# Allegro board mib_rev1_v2t_m1_gnd_moved.brd
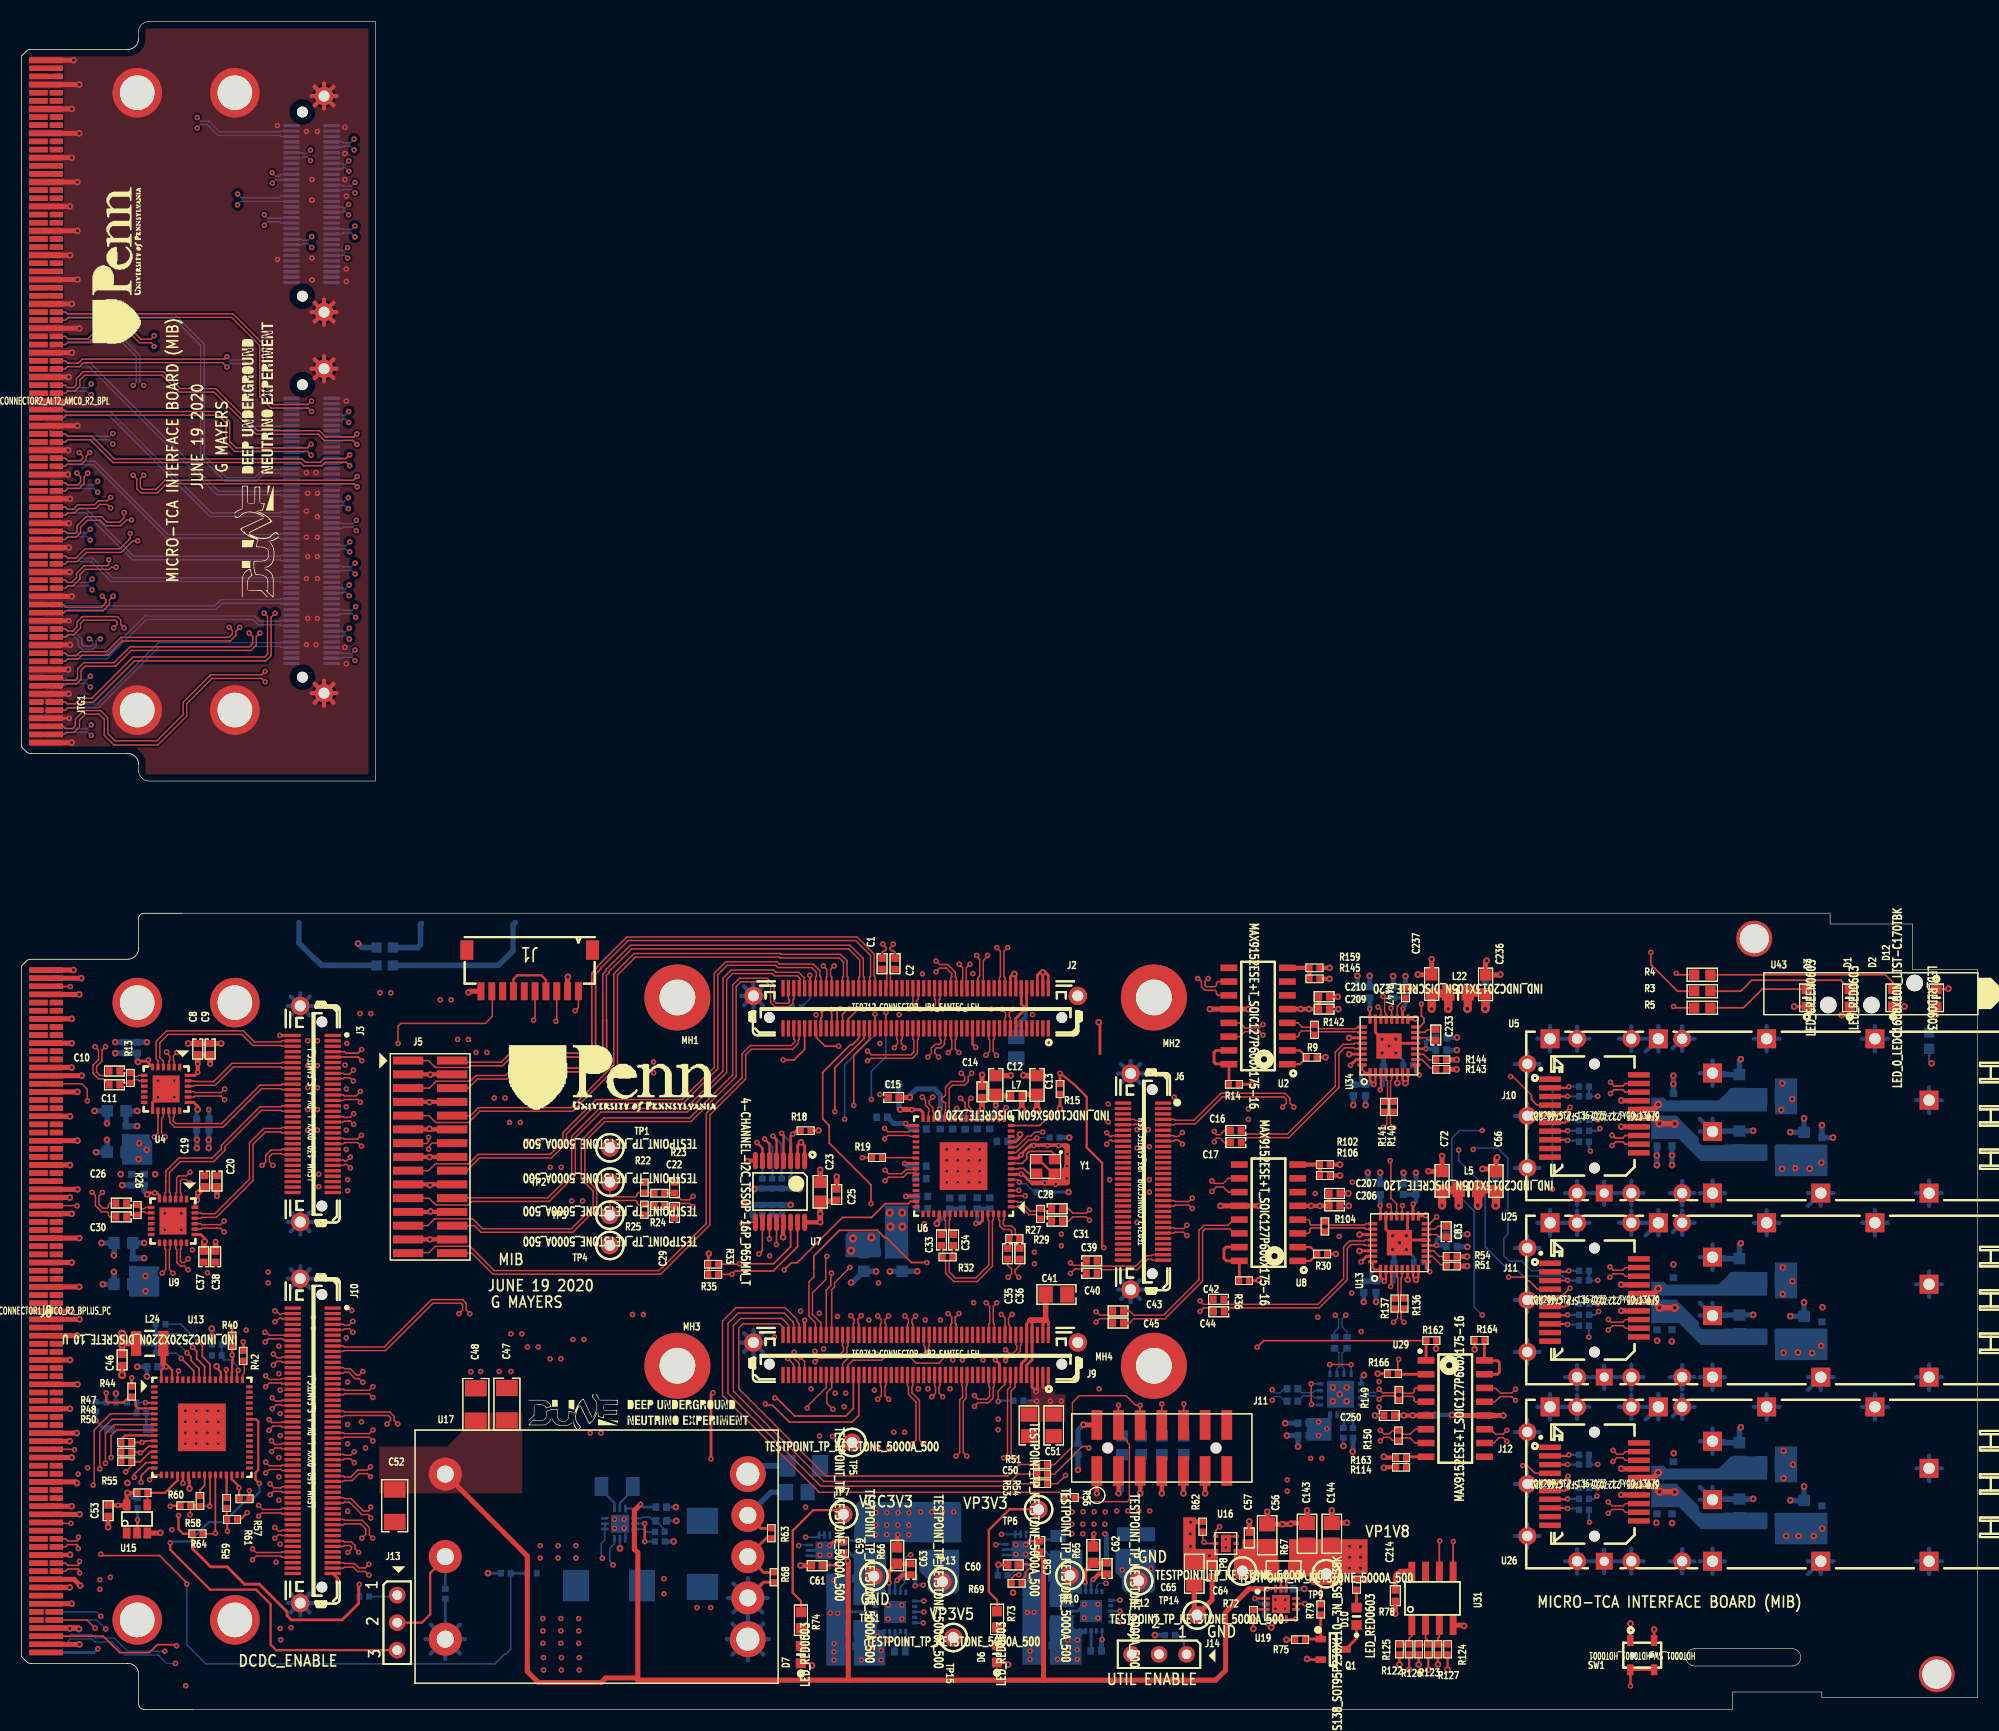
[diagram p0: board, top side]
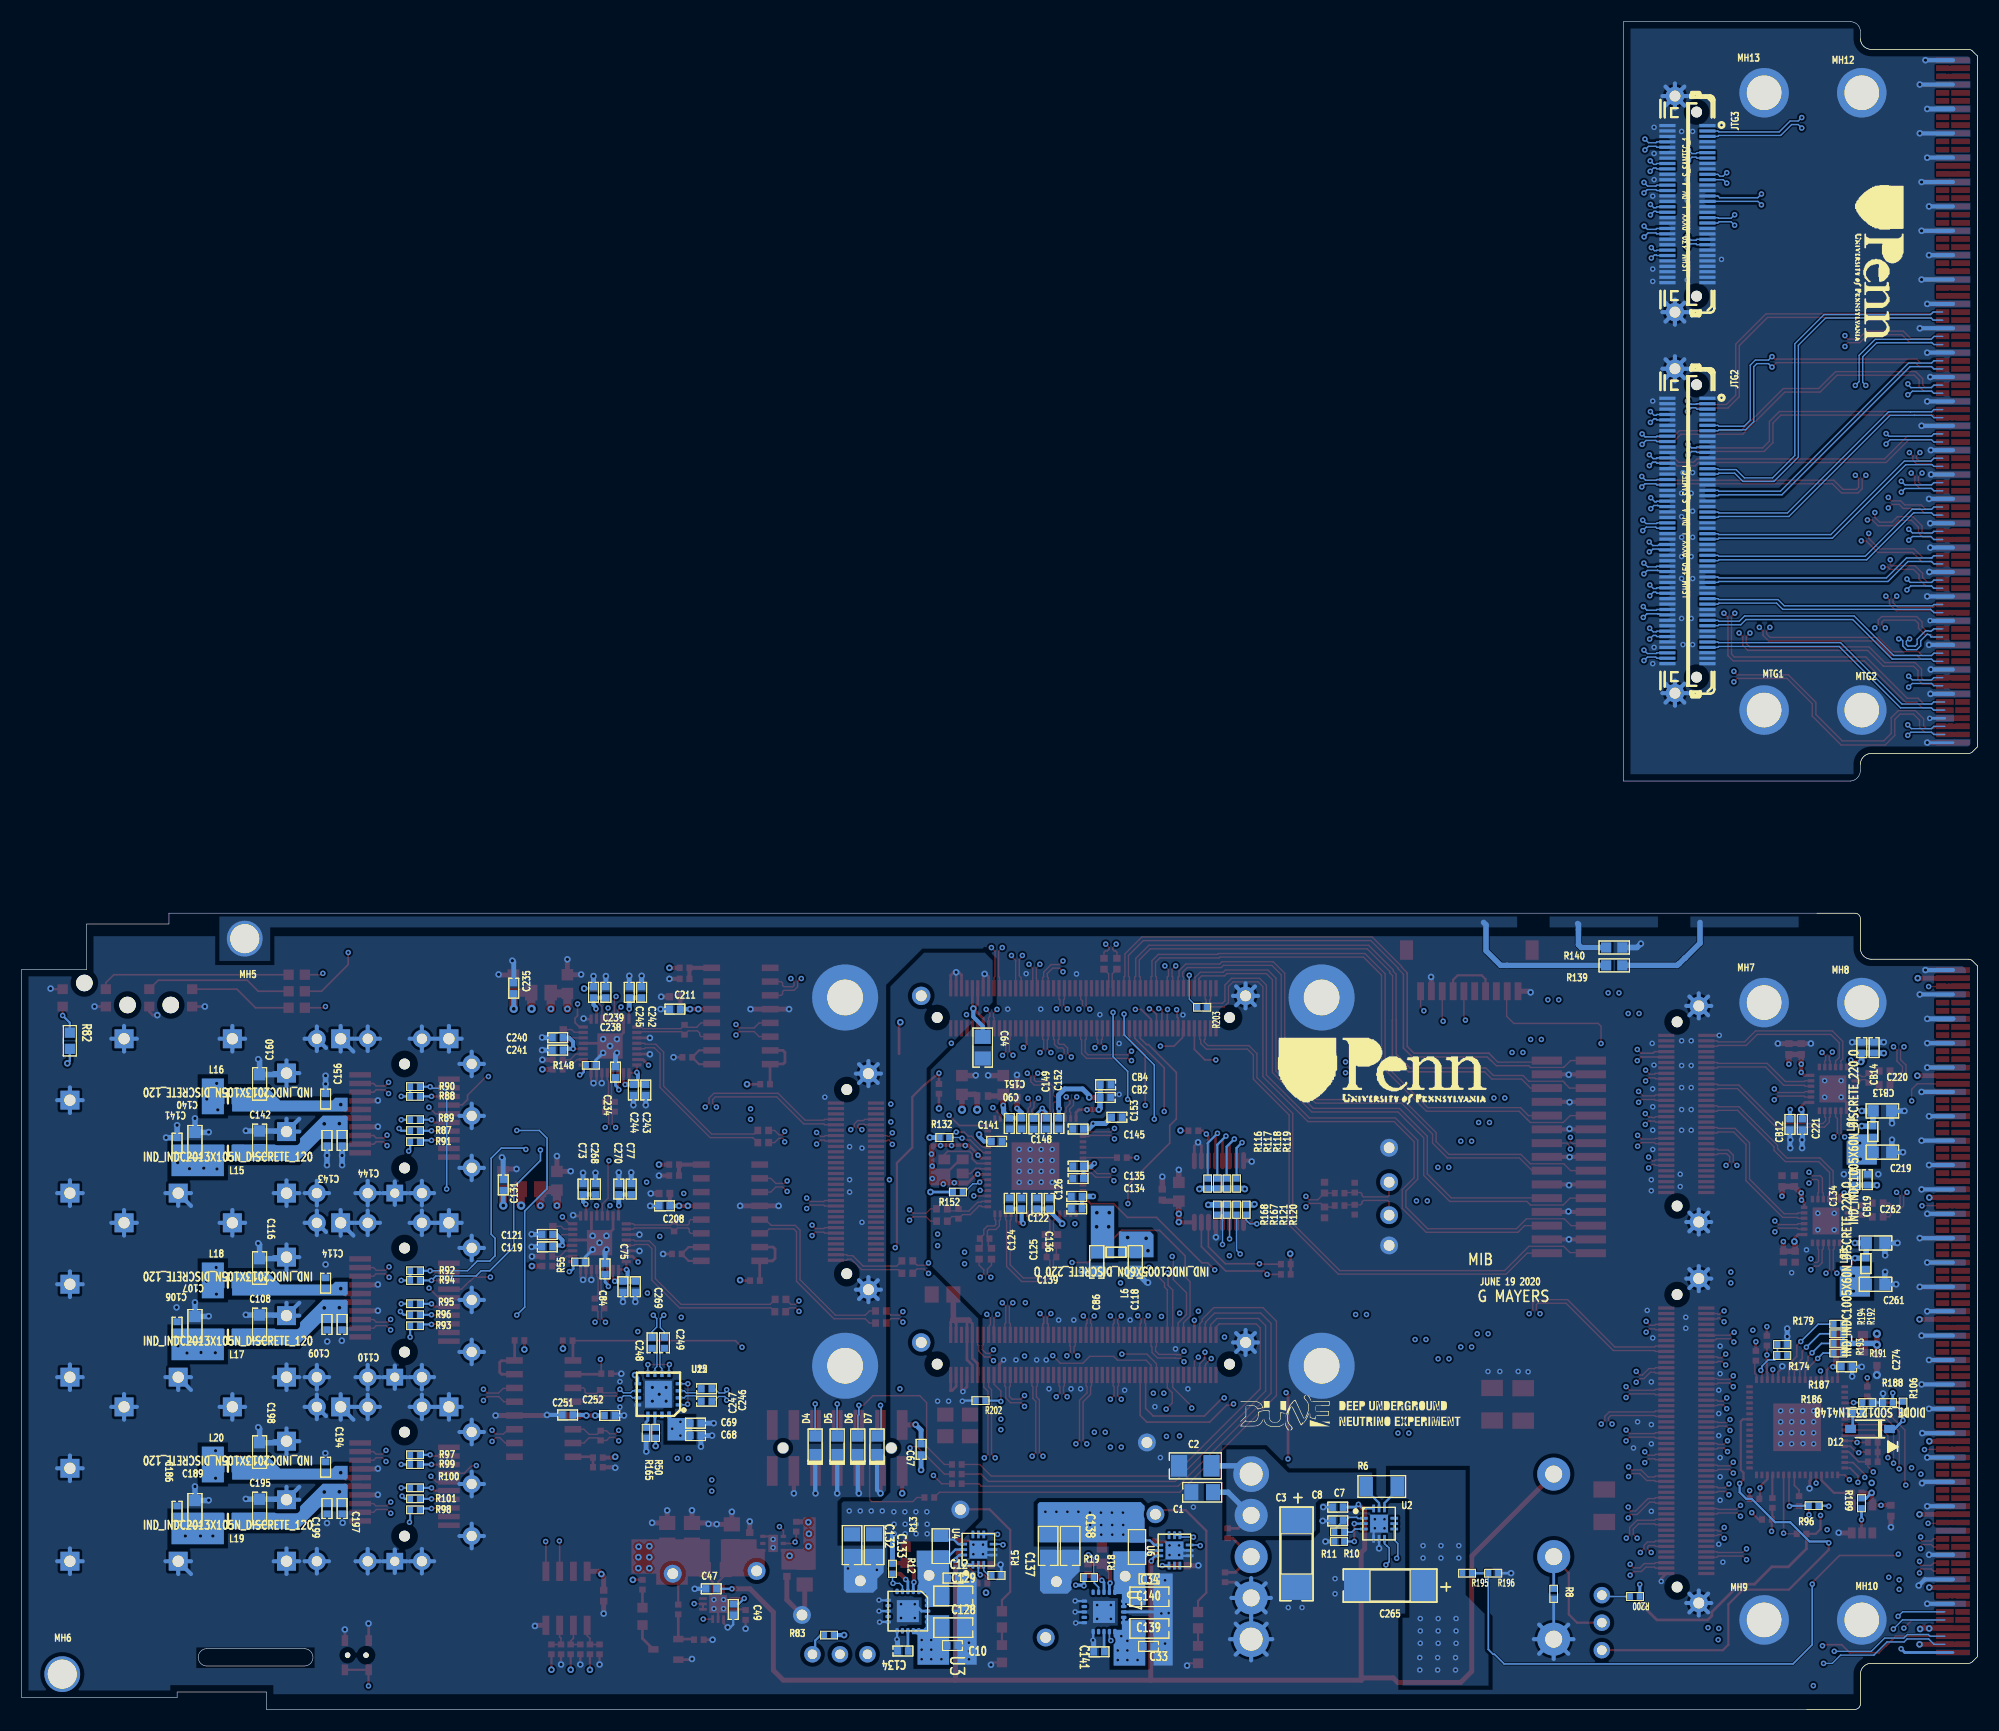
[diagram p1: board, bottom side, seen from below]

Outline 180.6 x 155.81 mm; copper layers: TOP, 02_GND, 03_SIG1, 04_GND, 05_PWR1, 06_GND, 07_SIG2, 08_GND, 09_SIG3, BOTTOM. Coordinates in mm from the lower left corner of the outline.
Outline path: 0,152.65 0.46,153.1 arc(0.62,153.21) 0.8,153.25 0.83,153.25 9.8,153.25 arc(10.51,153.54) 10.8,154.25 10.8,154.99 arc(11.11,155.57) 11.73,155.81 32.67,155.81 32.67,85.7 11.72,85.7 arc(11.06,86.01) 10.8,86.68 10.8,87.25 arc(10.5,87.96) 9.8,88.25 0.8,88.25 arc(0.62,88.28) 0.46,88.39 0,88.85 0,152.65 ; 0,68.65 0.46,69.11 arc(0.62,69.21) 0.8,69.25 0.83,69.25 9.8,69.25 arc(10.51,69.54) 10.8,70.25 10.8,73.01 arc(10.95,73.36) 11.3,73.5 167,73.5 167,72.5 174.6,72.5 174.6,68.3 180.6,68.3 180.6,1.1 166.24,1.1 166.24,1.6 158,1.6 158,0 11.27,0 arc(11.06,0.06) 10.89,0.21 arc(10.82,0.34) 10.8,0.49 10.8,3.26 arc(10.5,3.96) 9.8,4.25 0.8,4.25 arc(0.62,4.29) 0.46,4.39 0,4.85 0,68.65 ; 154.5,4 arc(153.7,4.8) 154.5,5.6 163.5,5.6 arc(164.3,4.8) 163.5,4 154.5,4

## Design rules (mm)
constraint set DEFAULT: min track width 0.127
net group AUXIO_0: nets AUXIO_N0 AUXIO_P0
net group AUXIO_1: nets AUXIO_N1 AUXIO_P1
net group AUXIO_2: nets AUXIO_N2 AUXIO_P2
net group AUXIO_3: nets AUXIO_N3 AUXIO_P3
net group AUXIO_4: nets AUXIO_N4 AUXIO_P4
net group AUXIO_5: nets AUXIO_N5 AUXIO_P5
net group AUXIO_6: nets AUXIO_N6 AUXIO_P6
net group AUXIO_7: nets AUXIO_N7 AUXIO_P7
net group BLUE_LED: nets BLUE_LED N107157740
net group BP.AMC_IPMB_SCL: nets BP.AMC_IPMB_SCL N11554098
net group BP.AMC_N-PS0: nets BP.AMC_N-PS0 N11554644
net group BP.AMC_N-PS1: nets BP.AMC_N-PS1 N11587411
net group BP.DATA_IN1_12047692: nets BP.DATA_IN_N1_12047692 BP.DATA_IN_P1_12047692
net group BP.DATA_IN4_12047692: nets BP.DATA_IN_N4_12047692 BP.DATA_IN_P4_12047692
net group BP.DATA_IN5_12047692: nets BP.DATA_IN_N5_12047692 BP.DATA_IN_P5_12047692
net group BP.DATA_IN8_12047692: nets BP.DATA_IN_N8_12047692 BP.DATA_IN_P8_12047692
net group BP.DATA_IN9_12047692: nets BP.DATA_IN_N9_12047692 BP.DATA_IN_P9_12047692
net group BP.DATA_OUT1_12047692: nets BP.DATA_OUT_N1_12047692 BP.DATA_OUT_P1_12047692
net group BP.DATA_OUT3_12047692: nets BP.DATA_OUT_N3_12047692 BP.DATA_OUT_P3_12047692
net group BP.DATA_OUT4_12047692: nets BP.DATA_OUT_N4_12047692 BP.DATA_OUT_P4_12047692
net group BP.DATA_OUT5_12047692: nets BP.DATA_OUT_N5_12047692 BP.DATA_OUT_P5_12047692
net group BP.DATA_OUT7_12047692: nets BP.DATA_OUT_N7_12047692 BP.DATA_OUT_P7_12047692
net group BP.DATA_OUT9_12047692: nets BP.DATA_OUT_N9_12047692 BP.DATA_OUT_P9_12047692
net group BP.FPGA_GBE_RX: nets BP.FPGA_GBE_RXN BP.FPGA_GBE_RXP
net group BP.FPGA_GBE_TX: nets BP.FPGA_GBE_TXN BP.FPGA_GBE_TXP
net group BP.REF_CLK1_12047692: nets BP.REF_CLK_N1_12047692 BP.REF_CLK_P1_12047692
net group BP.REF_CLK6_12047692: nets BP.REF_CLK_N6_12047692 BP.REF_CLK_P6_12047692
net group BP.REF_CLK9_12047692: nets BP.REF_CLK_N9_12047692 BP.REF_CLK_P9_12047692
net group BP.REF_CLK10_12047692: nets BP.REF_CLK_N10_12047692 BP.REF_CLK_P10_12047692
net group BP[0..179]: nets B15_L 13_ P VCC1V5
net group CDR0_CLKOUT: nets CDR0_CLKOUT_N CDR0_CLKOUT_P
net group CDR0_IN_N: nets CDR0_IN_N SFP.RD_N1
net group CDR0_IN_P: nets CDR0_IN_P SFP.RD_P1
net group CDR1_CLKOUT: nets CDR1_CLKOUT_N CDR1_CLKOUT_P
net group CDR1_IN_N: nets CDR1_IN_N SFP.RD_N2
net group CDR1_IN_P: nets CDR1_IN_P SFP.RD_P2
net group CDR_CLK_IN_N0: nets CDR_CLK_IN_N0 TIMING.CDR_CLK_IN_N0
net group CDR_CLK_IN_N1: nets CDR_CLK_IN_N1 TIMING.CDR_CLK_IN_N1
net group CDR_CLK_IN_N2: nets CDR_CLK_IN_N2 TIMING.CDR_CLK_IN_N2
net group CDR_CLK_IN_P0: nets CDR_CLK_IN_P0 TIMING.CDR_CLK_IN_P0
net group CDR_CLK_IN_P1: nets CDR_CLK_IN_P1 TIMING.CDR_CLK_IN_P1
net group CDR_CLK_IN_P2: nets CDR_CLK_IN_P2 TIMING.CDR_CLK_IN_P2
net group CDR_DATA_IN_N0: nets CDR_DATA_IN_N0 TIMING.CDR_DATA_IN_N0
net group CDR_DATA_IN_N1: nets CDR_DATA_IN_N1 TIMING.CDR_DATA_IN_N1
net group CDR_DATA_IN_P0: nets CDR_DATA_IN_P0 TIMING.CDR_DATA_IN_P0
net group CDR_DATA_IN_P1: nets CDR_DATA_IN_P1 TIMING.CDR_DATA_IN_P1
net group CLK_N0: nets CDR0_CLKGEN_N CLK_N0
net group CLK_N1: nets CDR1_CLKGEN_N CLK_N1
net group CLK_N2: nets CLK_N2 FBCLK_N
net group CLK_OUT_N0: nets CLK_OUT_N0 SCOPE_N
net group CLK_OUT_P0: nets CLK_OUT_P0 SCOPE_P
net group CLK_P0: nets CDR0_CLKGEN_P CLK_P0
net group CLK_P1: nets CDR1_CLKGEN_P CLK_P1
net group CLK_P2: nets CLK_P2 FBCLK_P
net group DFF_DATA_OUT: nets DFF_DATA_OUT_N DFF_DATA_OUT_P
net group DFF_IN_N: nets DFF_IN_N DFF_REF_CLK_N
net group DFF_IN_P: nets DFF_IN_P DFF_REF_CLK_P
net group DP_TIMING.UPSTREAM_DATA_1: nets TIMING.UPSTREAM_DATA_N1 TIMING.UPSTREAM_DATA_P1
net group FPGA_TCK: nets FPGA_TCK TCK
net group FPGA_TDI: nets FPGA_TDI TDI
net group FPGA_TDO: nets FPGA_TDO TDO
net group FPGA_TMS: nets FPGA_TMS TMS
net group GREEN_LED: nets GREEN_LED N107157420
net group N10522537: nets N10522537 N10522541
net group N11743411: nets N11743411 N11743467
net group N105492612: nets N10549361 N105492612
net group N105747613: nets N10574837 N105747613
net group RCLK_N0: nets RCLK_N0 REFCLK_OUT0_N
net group RCLK_N1: nets RCLK_N1 REFCLK_OUT1_N
net group RCLK_P0: nets RCLK_P0 REFCLK_OUT0_P
net group RCLK_P1: nets RCLK_P1 REFCLK_OUT1_P
net group RED_LED: nets N107157580 RED_LED
net group SEGMENT1: nets SEGMENT1 SEGMENT3
net group SFP.RD_0: nets SFP.RD_N0 SFP.RD_P0
net group SFP.TD_0: nets SFP.TD_N0 SFP.TD_P0
net group SFP.TD_1: nets SFP.TD_N1 SFP.TD_P1
net group SFP.TD_2: nets SFP.TD_N2 SFP.TD_P2
net group SNS1: nets N10556806 SNS1
net group SNS3: nets N10932588 SNS3
net group UDATA_IN_N: nets TIMING.UPSTREAM_DATA_N0 UDATA_IN_N
net group UDATA_IN_P: nets TIMING.UPSTREAM_DATA_P0 UDATA_IN_P
net group BP.AMC_GA0: nets BP.AMC_GA0 BP.AMC_GA1 BP.AMC_GA2 N11555817
net group BP[0..180]: nets BP.AMC_IPMB_SDA BP.AMC_N-ENABLE BP.DATA_IN_N0 BP.DATA_IN_N1 BP.DATA_IN_N2 BP.DATA_IN_N3 BP.DATA_IN_N4 BP.DATA_IN_N5 BP.DATA_IN_N6 BP.DATA_IN_N7 BP.DATA_IN_N8 BP.DATA_IN_N9 BP.DATA_IN_N10 BP.DATA_IN_N11 BP.DATA_IN_P0 BP.DATA_IN_P1 BP.DATA_IN_P2 BP.DATA_IN_P3 BP.DATA_IN_P4 BP.DATA_IN_P5 BP.DATA_IN_P6 BP.DATA_IN_P7 BP.DATA_IN_P8 BP.DATA_IN_P9 BP.DATA_IN_P10 BP.DATA_IN_P11 BP.DATA_OUT_N0 BP.DATA_OUT_N1 BP.DATA_OUT_N2 BP.DATA_OUT_N3 BP.DATA_OUT_N4 BP.DATA_OUT_N5 BP.DATA_OUT_N6 BP.DATA_OUT_N7 BP.DATA_OUT_N8 BP.DATA_OUT_N9 BP.DATA_OUT_N10 BP.DATA_OUT_N11 BP.DATA_OUT_P0 BP.DATA_OUT_P1 BP.DATA_OUT_P2 BP.DATA_OUT_P3 BP.DATA_OUT_P4 BP.DATA_OUT_P5 BP.DATA_OUT_P6 BP.DATA_OUT_P7 BP.DATA_OUT_P8 BP.DATA_OUT_P9 BP.DATA_OUT_P10 BP.DATA_OUT_P11 BP.PWR_ON BP.REF_CLK_N0 BP.REF_CLK_N1 BP.REF_CLK_N2 BP.REF_CLK_N3 BP.REF_CLK_N4 BP.REF_CLK_N5 BP.REF_CLK_N6 BP.REF_CLK_N7 BP.REF_CLK_N8 BP.REF_CLK_N9 BP.REF_CLK_N10 BP.REF_CLK_N11 BP.REF_CLK_P0 BP.REF_CLK_P1 BP.REF_CLK_P2 BP.REF_CLK_P3 BP.REF_CLK_P4 BP.REF_CLK_P5 BP.REF_CLK_P6 BP.REF_CLK_P7 BP.REF_CLK_P8 BP.REF_CLK_P9 BP.REF_CLK_P10 BP.REF_CLK_P11 BP.TCK BP.TDI BP.TDO BP.TMS
net group POWER[0..10]: nets POWER.DCDC_ENABLE POWER.DCDC_PG POWER.PG_VCC3V3 POWER.PG_VP1V8 POWER.SENSE_12C_SCL POWER.SENSE_12C_SDA
net group SFP[0..29]: nets SFP.LOS0 SFP.LOS1 SFP.LOS2 SFP.RATE_SELECT0 SFP.RATE_SELECT1 SFP.RATE_SELECT2 SFP.SCL0 SFP.SCL1 SFP.SCL2 SFP.SDA0 SFP.SDA1 SFP.SDA2 SFP.TX_DISABLE0 SFP.TX_DISABLE1 SFP.TX_DISABLE2 SFP.TX_FAULT0 SFP.TX_FAULT1 SFP.TX_FAULT2
net group TIMING[0..27]: nets TIMING.CDR_LOL0 TIMING.CDR_LOL1 TIMING.CDR_LOS0 TIMING.CDR_LOS1 TIMING.CLK_I2C_SCL TIMING.CLK_I2C_SDA TIMING.CLK_SEL0 TIMING.CLK_SEL1 TIMING.CLKGEN_INTR TIMING.CLKGEN_LOL TIMING.CLKGEN_RST TIMING.SFP_SEL0 TIMING.SFP_SEL1 TIMING.SFP_SEL2

## Placement (name value [footprint] x y rotation side)
C1  0.1UF  [CAP0402]  79.46 68.83 90 top
C2  0.1UF  [CAP0402]  80.65 68.83 90 top
C3  22UF  [CAP0603]  130.21 66.95 90 top
C4  10UF  [CAP0603]  135.18 66.93 90 top
C5  0.1UF  [CAP0402]  120.27 65.79 0 top
C6  1UF  [CAP0402]  120.27 64.64 0 top
C7  0.47UF  [CAP0402]  130.59 62.26 270 top
C8  0.1UF  [CAP0402]  16.26 60.96 90 top
C9  1UF  [CAP0402]  17.4 60.96 90 top
C10  0.1UF  [CAP0402]  8.57 58.93 0 top
C11  0.1UF  [CAP0402]  8.57 57.66 0 top
C12  10UF  [CAP0603]  89.96 57.64 90 top
C13  10UF  [CAP0603]  93.77 57.64 90 top
C14  0.1UF  [CAP0402]  88.69 57.01 90 top
C15  0.1UF  [CAP0402]  80.52 56.49 180 top
C16  0.1UF  [CAP0402]  112.12 53.44 0 top
C17  0.1UF  [CAP0402]  112.12 52.32 0 top
C18  22UF  [CAP0603]  131.17 48.79 90 top
C19  0.1UF  [CAP0402]  16.9 48.77 90 top
C20  1UF  [CAP0402]  18.04 48.77 90 top
C21  10UF  [CAP0603]  136.15 48.77 90 top
C22  5.0PF  [CAP0402]  60.29 48.16 90 top
C23  10UF  [CAP0603]  73.74 47.78 90 top
C24  0.1UF  [CAP0402]  121.24 47.62 0 top
C25  0.1UF  [CAP0402]  75.27 47.52 90 top
C26  0.1UF  [CAP0402]  9.2 46.74 0 top
C27  1UF  [CAP0402]  121.24 46.48 0 top
C28  0.1UF  [CAP0402]  95.62 46.21 180 top
C29  5.0PF  [CAP0402]  60.29 45.88 270 top
C30  0.1UF  [CAP0402]  9.2 45.47 0 top
C31  0.1UF  [CAP0402]  95.62 45.07 180 top
C32  0.47UF  [CAP0402]  131.55 44.09 270 top
C33  0.1UF  [CAP0402]  84.94 43.33 270 top
C34  0.1UF  [CAP0402]  86.06 43.33 270 top
C35  0.1UF  [CAP0402]  91.04 42.06 90 top
C36  0.1UF  [CAP0402]  92.18 42.06 90 top
C37  0.1UF  [CAP0402]  16.82 41.78 270 top
C38  1UF  [CAP0402]  17.91 41.78 270 top
C39  0.1UF  [CAP0402]  98.81 41.4 180 top
C40  0.1UF  [CAP0402]  98.81 40.26 180 top
C41  47UF  [CAP0805]  95.56 38.3 0 top
C42  0.1UF  [CAP0402]  110.52 37.85 0 top
C43  0.1UF  [CAP0402]  101.25 36.78 0 top
C44  0.1UF  [CAP0402]  110.55 36.7 0 top
C45  0.1UF  [CAP0402]  101.25 35.66 0 top
C46  0.47UF  [CAP0402]  9.28 32.26 270 top
C47  22UF  [CAP1206]  44.81 28.17 90 top
C48  22UF  [CAP1206]  41.94 28.14 90 top
C49  1UF  [CAP0402]  126.29 27.13 180 top
C50  47UF  [CAP0805]  93.02 26.21 270 top
C51  47UF  [CAP0805]  95.31 26.21 270 top
C52  22UF  [CAP1206]  34.45 18.8 270 top
C53  0.1UF  [CAP0402]  7.98 18.34 270 top
C54  47UF  [CAP0805]  118.7 16.21 90 top
C55  47UF  [CAP0805]  120.99 16.21 90 top
C56  47UF  [CAP0805]  115.02 16.08 90 top
C57  0.1UF  [CAP0402]  113.37 15.82 90 top
C58  0.1UF  [CAP0402]  94.01 15.04 90 top
C59  0.1UF  [CAP0402]  75.9 14.96 90 top
C60  0.1UF  [CAP0402]  91.57 13.34 180 top
C61  0.1UF  [CAP0402]  73.46 13.26 180 top
C62  0.1UF  [CAP0402]  100.23 13 270 top
C63  0.1UF  [CAP0402]  82.12 12.93 270 top
C64  0.1UF  [CAP0402]  109.94 12.78 270 top
C65  47UF  [CAP0805]  108.29 12.52 270 top
C66  0.1UF  [CAP0402]  126.85 10.49 270 top
C67  0.01UF  [CAP0402]  81.11 5.31 0 bottom
C68  0.01UF  [CAP0402]  99.22 5.38 0 bottom
C69  0.1UF  [CAP0402]  76.54 5.82 180 bottom
C70  0.1UF  [CAP0402]  94.65 5.89 180 bottom
C71  47UF  [CAP0805]  76.46 7.47 180 bottom
C72  47UF  [CAP0805]  94.57 7.54 180 bottom
C73  0.1UF  [CAP0402]  114.89 9.22 270 bottom
C74  47UF  [CAP0805]  76.46 10.39 180 bottom
C75  47UF  [CAP0805]  94.57 10.46 180 bottom
C76  0.1UF  [CAP0402]  116.92 11.13 0 bottom
C77  470UF  [CAP2917]  54.23 11.43 0 bottom
C78  0.1UF  [CAP0402]  76.48 12.04 180 bottom
C79  0.1UF  [CAP0402]  94.59 12.12 180 bottom
C80  470UF  [CAP2917]  62.87 14.35 270 bottom
C81  47UF  [CAP0805]  85.81 15.09 270 bottom
C82  47UF  [CAP0805]  83.77 15.09 270 bottom
C83  47UF  [CAP0805]  103.92 15.16 270 bottom
C84  47UF  [CAP0805]  101.88 15.16 270 bottom
C85  0.1UF  [CAP0402]  59.06 17.4 0 bottom
C86  0.1UF  [CAP0402]  166.25 18.29 90 bottom
C87  10UF  [CAP0603]  164.6 18.41 90 bottom
C88  22UF  [CAP0603]  158.63 18.54 90 bottom
C89  1UF  [CAP0402]  152.41 18.54 270 bottom
C90  0.1UF  [CAP0402]  151.01 18.54 270 bottom
C91  0.1UF  [CAP0402]  59.06 18.67 0 bottom
C92  0.1UF  [CAP0805]  71.58 20.04 0 bottom
C93  0.1UF  [CAP0402]  152.53 22.35 90 bottom
C94  100UF  [CAP1206]  72.22 22.48 0 bottom
C95  22UF  [CAP0603]  158.63 23.75 90 bottom
C96  0.1UF  [CAP0402]  97.54 24 270 bottom
C97  0.1UF  [CAP0402]  118.37 25.27 180 bottom
C98  1UF  [CAP0402]  118.37 26.42 180 bottom
C99  1000PF  [CAP0402]  126.29 27.13 180 bottom
C100  0.1UF  [CAP0402]  130.18 27.18 0 bottom
C101  0.1UF  [CAP0402]  117.35 28.45 0 bottom
C102  0.1UF  [CAP0402]  117.35 29.59 0 bottom
C103  0.1UF  [CAP0402]  12.07 31.62 180 bottom
C104  0.1UF  [CAP0402]  122.38 33.83 270 bottom
C105  0.1UF  [CAP0402]  121.24 33.83 270 bottom
C106  0.1UF  [CAP0402]  166.25 35.28 90 bottom
C107  10UF  [CAP0603]  164.6 35.41 90 bottom
C108  22UF  [CAP0603]  158.63 35.53 90 bottom
C109  1UF  [CAP0402]  152.41 35.53 270 bottom
C110  0.1UF  [CAP0402]  151.01 35.53 270 bottom
C111  0.1UF  [CAP0402]  125.07 39.01 270 bottom
C112  1UF  [CAP0402]  123.93 39.01 270 bottom
C113  10UF  [CAP0603]  9.4 39.24 180 bottom
C114  0.1UF  [CAP0402]  152.53 39.34 90 bottom
C115  0.1UF  [CAP0402]  126.73 40.67 90 bottom
C116  22UF  [CAP0603]  158.63 40.74 90 bottom
C117  10UF  [CAP0603]  81.32 41.31 270 bottom
C118  10UF  [CAP0603]  77.76 41.31 270 bottom
C119  1UF  [CAP0402]  132.06 42.7 0 bottom
C120  10UF  [CAP0603]  9.4 43.05 180 bottom
C121  0.1UF  [CAP0402]  132.06 43.84 0 bottom
C122  0.1UF  [CAP0402]  83.17 46.21 0 bottom
C123  1000PF  [CAP0402]  121.24 46.48 0 bottom
C124  1UF  [CAP0402]  86.85 46.71 90 bottom
C125  0.1UF  [CAP0402]  85.7 46.71 90 bottom
C126  1UF  [CAP0402]  89.39 46.72 90 bottom
C127  1UF  [CAP0402]  88.25 46.72 90 bottom
C128  0.1UF  [CAP0402]  83.17 47.35 0 bottom
C129  0.1UF  [CAP0402]  128.76 48.03 90 bottom
C130  1UF  [CAP0402]  127.61 48.03 90 bottom
C131  1UF  [CAP0402]  125.46 48.03 90 bottom
C132  0.1UF  [CAP0402]  124.31 48.03 90 bottom
C133  0.1UF  [CAP0402]  136.12 48.41 90 bottom
C134  0.1UF  [CAP0402]  11.31 48.9 90 bottom
C135  0.1UF  [CAP0402]  10.17 48.9 90 bottom
C136  0.1UF  [CAP0402]  83.04 49 0 bottom
C137  1UF  [CAP0402]  83.04 50.15 0 bottom
C138  10UF  [CAP0603]  8.77 51.44 180 bottom
C139  0.1UF  [CAP0402]  166.25 52.27 90 bottom
C140  10UF  [CAP0603]  164.6 52.4 90 bottom
C141  1UF  [CAP0402]  90.56 52.43 180 bottom
C142  22UF  [CAP0603]  158.63 52.53 90 bottom
C143  1UF  [CAP0402]  152.41 52.53 270 bottom
C144  0.1UF  [CAP0402]  151.01 52.53 270 bottom
C145  1UF  [CAP0402]  83.04 53.58 0 bottom
C146  1UF  [CAP0402]  17.3 54 270 bottom
C147  0.1UF  [CAP0402]  16.16 54 270 bottom
C148  0.1UF  [CAP0402]  87.13 54.05 270 bottom
C149  1UF  [CAP0402]  85.98 54.08 270 bottom
C150  0.1UF  [CAP0402]  89.39 54.08 270 bottom
C151  1UF  [CAP0402]  88.25 54.08 270 bottom
C152  1UF  [CAP0402]  84.82 54.08 270 bottom
C153  0.1UF  [CAP0402]  79.46 54.66 180 bottom
C154  10UF  [CAP0603]  8.77 55.24 180 bottom
C155  0.1UF  [CAP0402]  152.53 56.34 90 bottom
C156  0.1UF  [CAP0402]  80.52 56.49 180 bottom
C157  0.1UF  [CAP0402]  124.11 57.18 270 bottom
C158  1UF  [CAP0402]  122.97 57.18 270 bottom
C159  1UF  [CAP0402]  80.5 57.66 180 bottom
C160  22UF  [CAP0603]  158.63 57.73 90 bottom
C161  0.1UF  [CAP0402]  125.76 58.83 90 bottom
C162  1UF  [CAP0402]  131.09 60.86 0 bottom
C163  47UF  [CAP0805]  91.85 61.09 270 bottom
C164  0.1UF  [CAP0402]  10.67 61.09 90 bottom
C165  0.1UF  [CAP0402]  9.53 61.09 90 bottom
C166  0.1UF  [CAP0402]  131.09 62 0 bottom
C167  1000PF  [CAP0402]  120.27 64.64 0 bottom
C168  0.1UF  [CAP0402]  127.79 66.19 90 bottom
C169  1UF  [CAP0402]  126.65 66.19 90 bottom
C170  1UF  [CAP0402]  124.49 66.19 90 bottom
C171  0.1UF  [CAP0402]  123.35 66.19 90 bottom
C172  0.1UF  [CAP0402]  135.16 66.57 90 bottom
D1  Green  [LEDC1608X80N]  164.85 65.68 90 top
D2  Red  [LEDC1608X80N]  168.81 65.68 90 top
D3  LTST-C170TBKT  [LEDC1608X80N]  172.83 65.68 90 top
D4  Red  [LEDC1608X80N]  176.81 65.68 270 top
D5  Red  [LEDC1608X80N]  123.27 8.59 90 top
D6  Red  [LEDC1608X80N]  90.07 5.13 90 top
D7  Red  [LEDC1608X80N]  71.96 5.05 90 top
D8  PGB1010603NR  [D0603]  107.32 24.38 90 bottom
D9  PGB1010603NR  [D0603]  105.29 24.38 90 bottom
D10  PGB1010603NR  [D0603]  103.39 24.38 90 bottom
D11  PGB1010603NR  [D0603]  101.61 24.38 90 bottom
D12  1N4148  [SOD123]  9.91 25.88 0 bottom
J1  CONN10_SIP  [M4010C]  51.41 66.29 180 top
J2  LSHM-150-03.0-L-DV-A-S-K-TR  [SAMTEC_LSHM-150-04-0-L-DV-A-S]  82.56 64.77 0 top
J3  LSHM-130-03.0-L-DV-A-S-K-TR  [SAMTEC_LSHM-130-04-0-L-DV-A-S]  26.83 54.97 90 top
J4  1367073-1  [TYCO_1367073]  145.24 54.78 0 top
J5  -  [FTSH-115-01-L-DV]  37.72 51 0 top
J6  LSHM-130-03.0-L-DV-A-S-K-TR  [SAMTEC_LSHM-130-04-0-L-DV-A-S]  103.51 48.72 90 top
J7  1367073-1  [TYCO_1367073]  145.24 37.79 0 top
J8  MCH_TG1-EDGE-170  [AMC0_R2_BPLUS_PCB_EDGE]  2.25 36.75 0 top
J9  LSHM-150-03.0-L-DV-A-S-K-TR  [SAMTEC_LSHM-150-04-0-L-DV-A-S]  82.56 32.77 0 top
J10  LSHM-150-03.0-L-DV-A-S-K-TR  [SAMTEC_LSHM-150-04-0-L-DV-A-S]  26.83 24.79 90 top
J11  7x2RECPT_SMD_2mm  [HDR14PINSMD]  105.29 24.13 180 top
J12  1367073-1  [TYCO_1367073]  145.24 20.8 0 top
J13  HDR1x3  [HDR_1X3]  34.68 10.54 270 top
J14  HDR1x3  [HDR_1X3]  107.57 5.08 180 top
JTG1  MCH_TG2-EDGE-170_ALT2  [AMC0_R2_BPLUS_PCB_EDGE]  2.25 120.75 0 top
JTG2  LSHM-150-03.0-L-DV-A-S-K-TR  [SAMTEC_LSHM-150-04-0-L-DV-A-S]  26.83 108.79 90 bottom
JTG3  LSHM-130-03.0-L-DV-A-S-K-TR  [SAMTEC_LSHM-130-04-0-L-DV-A-S]  26.83 138.96 90 bottom
L5  120  Ohm@100MHz  [INDC2013X105N]  133.61 48.01 180 top
L6  220 Ohm  [INDC1005X60N]  79.54 42.2 0 bottom
L7  220 Ohm  [INDC1005X60N]  91.86 56.62 180 top
L15  120  Ohm@100MHz  [INDC2013X105N]  161.55 51.38 180 bottom
L16  120  Ohm@100MHz  [INDC2013X105N]  161.55 56.59 0 bottom
L17  120  Ohm@100MHz  [INDC2013X105N]  161.55 34.39 180 bottom
L18  120  Ohm@100MHz  [INDC2013X105N]  161.55 39.6 0 bottom
L19  120  Ohm@100MHz  [INDC2013X105N]  161.55 17.4 180 bottom
L20  120  Ohm@100MHz  [INDC2013X105N]  161.55 22.61 0 bottom
L21  220 Ohm  [INDC1005X60N]  9.66 53.34 90 bottom
L22  120  Ohm@100MHz  [INDC2013X105N]  132.64 66.17 180 top
L23  220 Ohm  [INDC1005X60N]  10.29 41.15 90 bottom
L24  10 uH  [INDC2520X220N]  11.82 33.78 180 top
MH1  Mt_Hole  [MOUNTHOLE]  60.56 65.72 0 top
MH2  Mt_Hole  [MOUNTHOLE]  104.56 65.72 0 top
MH3  Mt_Hole  [MOUNTHOLE]  60.56 31.72 0 top
MH4  Mt_Hole  [MOUNTHOLE]  104.56 31.72 0 top
MH5  Mt_Hole  [MOUNTHOLE]  160 71.15 180 bottom
MH6  Mt_Hole  [MOUNTHOLE]  176.85 3.25 180 bottom
MH7  Mt_Hole  [MOUNTHOLE]  19.69 65.24 180 bottom
MH8  Mt_Hole  [MOUNTHOLE]  10.67 65.24 180 bottom
MH9  Mt_Hole  [MOUNTHOLE]  19.69 8.26 180 bottom
MH10  Mt_Hole  [MOUNTHOLE]  10.67 8.26 180 bottom
MTG1  Mt_Hole  [MOUNTHOLE]  19.69 92.25 180 bottom
MTG2  Mt_Hole  [MOUNTHOLE]  10.67 92.25 180 bottom
MTG3  Mt_Hole  [MOUNTHOLE]  19.69 149.24 180 bottom
MTG4  Mt_Hole  [MOUNTHOLE]  10.67 149.24 180 bottom
NOREF  -  []  158 0.73 0 top
NOREF#2  -  []  -255.82 -99.62 0 top
NOREF#3  -  []  32.67 85.7 90 top
NOREF#4  -  []  0.77 153.25 0 top
NOREF#5  -  []  178.32 68.3 90 top
NOREF#6  -  []  161.05 4 90 top
NOREF#7  -  []  167 73.04 0 top
NOREF#8  -  []  0 64.12 0 top
NOREF#9  -  []  0.92 4.25 90 top
NOREF#10  -  []  46.82 25.83 0 top
NOREF#11  -  []  157.38 0 90 top
NOREF#12  -  []  0 39.45 0 top
NOREF#13  -  []  10.8 72.31 0 top
NOREF#14  -  []  153.74 4.81 0 top
NOREF#15  -  []  -26.64 123.32 0 top
NOREF#16  -  []  -27.5 136.85 0 top
NOREF#17  -  []  44.48 53.98 0 top
NOREF#18  -  []  5.36 4.25 90 top
NOREF#19  -  []  23.75 102.67 90 top
NOREF#20  -  []  0 152.61 0 top
NOREF#21  -  []  153.92 4.25 0 top
NOREF#22  -  []  15.11 0 90 top
NOREF#23  -  []  12.04 125.75 90 top
NOREF#24  -  []  -27.5 124.03 0 top
NOREF#25  -  []  0.8 88.25 90 top
NOREF#26  -  []  68.05 25.73 180 bottom
NOREF#27  -  []  65.03 54.66 180 bottom
NOREF#28  -  []  12.32 141.05 270 bottom
Q2  BSS138K  [SOT95P230X110-3N]  121.11 5.54 0 top
R1  4.99k  [RES0402]  119.39 68.45 0 top
R2  160 Ohm  [RES0603]  155.2 67.82 180 top
R3  DNP  [RES0402]  119.39 67.44 0 top
R4  249 Ohm  [RES0603]  155.2 66.29 180 top
R5  4.99k  [RES0402]  127.79 66.12 270 top
R6  249 Ohm  [RES0603]  155.2 64.77 180 top
R7  100  [RES0402]  119.39 62.74 90 top
R9  4.99k  [RES0402]  119.13 60.2 180 top
R11  4.99k  [RES0402]  131.09 59.97 180 top
R12  4.99k  [RES0402]  131.09 59.08 180 top
R13  100  [RES0402]  10.04 58.29 270 top
R14  4.99k  [RES0402]  111.94 57.71 0 top
R15  4.99k  [RES0402]  95.89 57.28 90 top
R16  0  [RES0402]  125.84 55.63 90 top
R17  0  [RES0402]  126.7 55.63 90 top
R18  2.2k  [RES0402]  72.4 53.42 180 top
R19  4.99k  [RES0402]  79 50.93 0 top
R20  4.99k  [RES0402]  120.35 50.29 0 top
R21  DNP  [RES0402]  120.35 49.28 0 top
R22  49.9  [RES0402]  57.5 48.16 90 top
R23  499 Ohm  [RES0402]  58.89 47.65 180 top
R24  499 Ohm  [RES0402]  58.89 46.51 180 top
R25  49.9  [RES0402]  57.5 46.13 270 top
R26  100  [RES0402]  10.67 46.1 270 top
R27  100  [RES0402]  94.09 45.75 90 top
R28  100  [RES0402]  120.35 44.58 90 top
R29  100  [RES0402]  91.67 43.46 0 top
R30  4.99k  [RES0402]  120.1 42.04 180 top
R31  4.99k  [RES0402]  132.06 41.81 180 top
R32  100  [RES0402]  85.5 41.76 180 top
R33  2.2k  [RES0402]  63.86 41.1 0 top
R34  4.99k  [RES0402]  132.06 40.92 180 top
R35  2.2k  [RES0402]  63.86 40.16 0 top
R36  4.99k  [RES0402]  112.88 39.57 0 top
R37  0  [RES0402]  126.8 37.47 90 top
R38  0  [RES0402]  127.67 37.47 90 top
R39  4.99k  [RES0402]  134.63 34.06 180 top
R40  33k  [RES0402]  19.44 34.04 270 top
R41  4.99k  [RES0402]  130.18 34.04 0 top
R42  33k  [RES0402]  20.45 32.64 270 top
R43  4.99k  [RES0402]  126.62 30.99 0 top
R44  4.7k  [RES0402]  10.17 29.34 270 top
R45  100  [RES0402]  127.18 29.03 270 top
R46  100  [RES0402]  127.13 25.27 270 top
R47  33k  [RES0402]  9.66 24.64 0 top
R48  33k  [RES0402]  9.66 23.75 0 top
R49  4.99k  [RES0402]  127.39 23.24 180 top
R50  33k  [RES0402]  9.66 22.86 0 top
R51  24.9  [RES0402]  94.24 22.61 180 top
R52  DNP  [RES0402]  127.39 22.35 180 top
R53  24.9  [RES0402]  94.24 21.72 180 top
R54  24.9  [RES0402]  94.24 20.83 180 top
R55  4.7k  [RES0402]  11.16 19.99 0 top
R56  24.9  [RES0402]  96.78 19.56 180 top
R57  2.2k  [RES0402]  20.58 19.43 180 top
R58  49.9  [RES0402]  16.46 19.23 270 top
R59  49.9  [RES0402]  18.93 19.05 270 top
R60  33k  [RES0402]  15.12 18.8 0 top
R61  2.2k  [RES0402]  19.44 17.53 180 top
R62  4.99k  [RES0402]  109.07 16.87 270 top
R63  8.66K  [RES0402]  69.22 16.26 90 top
R64  33k  [RES0402]  16.24 16.21 0 top
R65  10  [RES0603]  98.96 14.27 90 top
R66  10  [RES0603]  80.85 14.2 90 top
R67  0.02  [RES0805]  116.54 12.9 0 top
R68  DNP  [RES0402]  69.47 12.19 270 top
R69  0  [RES0402]  91.88 11.63 180 top
R70  4.99k  [RES0402]  123.27 11.51 270 top
R71  1k  [RES0402]  119.97 9.22 270 top
R72  0  [RES0402]  113.75 8.71 90 top
R73  249 Ohm  [RES0603]  90.07 8.31 90 top
R74  249 Ohm  [RES0603]  71.96 8.23 90 top
R75  10K  [RES0402]  118.06 6.43 180 top
R76  0  [RES0402]  127.23 5.54 270 top
R77  DNP  [RES0402]  128.12 5.54 90 top
R78  0  [RES0402]  129.01 5.54 270 top
R79  DNP  [RES0402]  129.9 5.54 90 top
R80  0  [RES0402]  130.79 5.54 270 top
R81  DNP  [RES0402]  131.68 5.54 90 top
R82  249 Ohm  [RES0603]  176.15 61.72 270 bottom
R83  10K  [RES0402]  106.05 6.86 0 bottom
R84  10K  [RES0402]  31.63 10.41 0 bottom
R85  10K  [RES0402]  39.12 10.67 270 bottom
R86  4.99k  [RES0402]  82.05 12.17 180 bottom
R87  0  [RES0402]  90.58 12.37 0 bottom
R88  10K  [RES0402]  47.12 12.57 180 bottom
R89  4.99k  [RES0402]  44.71 12.57 180 bottom
R90  4.99k  [RES0402]  100.18 12.98 270 bottom
R91  0.02  [RES0805]  77.6 14.99 90 bottom
R92  0.02  [RES0805]  95.71 15.06 90 bottom
R93  0  [RES0402]  58.93 15.49 180 bottom
R94  0  [RES0402]  58.93 16.38 180 bottom
R95  4.99k  [RES0402]  144.28 18.41 180 bottom
R96  33k  [RES0402]  15.12 18.8 0 bottom
R97  10K  [RES0402]  10.7 19.02 270 bottom
R98  4.99k  [RES0402]  144.28 19.43 180 bottom
R99  4.99k  [RES0402]  144.28 20.45 180 bottom
R100  0.005  [RES1206]  55 20.57 180 bottom
R101  4.99k  [RES0402]  144.28 22.61 180 bottom
R102  4.99k  [RES0402]  144.28 23.5 180 bottom
R103  4.99k  [RES0402]  122.94 25.53 90 bottom
R104  4.99k  [RES0402]  122.05 25.53 90 bottom
R105  33  [RES0402]  11.05 27.36 0 bottom
R106  150K  [RES0402]  6.86 27.94 270 bottom
R107  390K  [RES0402]  10.17 28.32 180 bottom
R108  330  [RES0402]  8.26 28.32 0 bottom
R109  10K  [RES0402]  92.05 28.5 180 bottom
R110  150K  [RES0402]  18.01 32.66 180 bottom
R111  1k  [RES0402]  12.83 32.89 0 bottom
R112  30k  [RES0402]  18.01 33.68 0 bottom
R113  1k  [RES0402]  12.83 33.78 0 bottom
R114  1k  [RES0402]  12.83 34.67 0 bottom
R115  4.99k  [RES0402]  144.28 35.41 180 bottom
R116  1k  [RES0402]  12.83 35.56 0 bottom
R117  4.99k  [RES0402]  144.28 36.42 180 bottom
R118  4.99k  [RES0402]  144.28 37.44 180 bottom
R119  4.99k  [RES0402]  144.28 39.6 180 bottom
R120  4.99k  [RES0402]  144.28 40.49 180 bottom
R121  100  [RES0402]  129.01 41.3 0 bottom
R122  2.2k  [RES0402]  70.19 46.13 270 bottom
R123  2.2k  [RES0402]  69.3 46.13 270 bottom
R124  2.2k  [RES0402]  68.41 46.13 270 bottom
R125  2.2k  [RES0402]  67.52 46.13 270 bottom
R126  4.99k  [RES0402]  94.14 47.76 0 bottom
R127  2.2k  [RES0402]  71.07 48.54 90 bottom
R128  2.2k  [RES0402]  70.19 48.54 90 bottom
R129  2.2k  [RES0402]  69.3 48.54 90 bottom
R130  2.2k  [RES0402]  68.41 48.54 90 bottom
R131  4.99k  [RES0402]  144.28 52.4 180 bottom
R132  4.99k  [RES0402]  95.39 52.79 180 bottom
R133  4.99k  [RES0402]  144.28 53.42 180 bottom
R134  4.99k  [RES0402]  144.28 54.43 180 bottom
R135  4.99k  [RES0402]  144.28 56.59 180 bottom
R136  4.99k  [RES0402]  144.28 57.48 180 bottom
R137  100  [RES0402]  128.05 59.46 0 bottom
R138  10K  [RES0402]  71.58 64.82 180 bottom
R139  10M  [RES0603]  33.53 68.68 0 bottom
R140  10M  [RES0603]  33.53 70.33 180 bottom
SW1  HDT0001  [SW_HDT0001]  149.65 5 180 top
TP1  5002 White  [TP_KEYSTONE_5000A]  54.32 51.84 180 top
TP2  5002 White  [TP_KEYSTONE_5000A]  54.32 48.67 180 top
TP3  5002 White  [TP_KEYSTONE_5000A]  54.32 45.62 180 top
TP4  5002 White  [TP_KEYSTONE_5000A]  54.32 42.83 180 top
TP5  5002 White  [TP_KEYSTONE_5000A]  76.69 24.64 0 top
TP6  5002 White  [TP_KEYSTONE_5000A]  93.91 18.44 270 top
TP7  5002 White  [TP_KEYSTONE_5000A]  75.9 18.01 270 top
TP8  5002 White  [TP_KEYSTONE_5000A]  112.73 12.78 0 top
TP9  5002 White  [TP_KEYSTONE_5000A]  120.48 12.52 0 top
TP10  5002 White  [TP_KEYSTONE_5000A]  96.8 12.37 270 top
TP11  5002 White  [TP_KEYSTONE_5000A]  78.69 12.29 270 top
TP12  5002 White  [TP_KEYSTONE_5000A]  103.15 11.86 270 top
TP13  5002 White  [TP_KEYSTONE_5000A]  85.04 11.79 270 top
TP14  5002 White  [TP_KEYSTONE_5000A]  108.54 8.71 0 top
TP15  5002 White  [TP_KEYSTONE_5000A]  86.04 6.63 0 top
U1  5151230F  [LP_515XXX]  170.82 65.02 270 top
U2  MAX9152ESE+T  [SOIC127P600X175-16N]  114.18 64.01 180 top
U3  ADN2814ACPZ  [QFN-32]  126.27 61.24 90 top
U4  SI53342-B-GM  [QFN_24]  13.34 57.28 270 top
U5  2227023-1  [SFP_CAGE]  145.24 54.78 180 top
U6  SI5395A-A-GM  [QFN_64]  86.98 50.15 180 top
U7  TCA9546APWR  [TSSOP-16P_P65MM]  70.03 47.8 270 top
U8  MAX9152ESE+T  [SOIC127P600X175-16N]  115.14 45.85 180 top
U9  SI53342-B-GM  [QFN_24]  13.98 45.09 270 top
U10  ADN2814ACPZ  [QFN-32]  127.23 43.08 90 top
U11  2227023-1  [SFP_CAGE]  145.24 37.79 180 top
U12  MAX9152ESE+T  [SOIC127P600X175-16N]  132.39 27.76 0 top
U13  ATMEGA128A-MU  [QFN_64]  16.64 26.04 0 top
U14  2227023-1  [SFP_CAGE]  145.24 20.8 180 top
U15  SN74LVC1G06  [SOT23-5]  10.65 17.58 90 top
U16  TPS74618PQWDRVRQ1  [6-WSON_2X2]  111.21 15.32 180 top
U17  UWS-3.3/15-Q48N-C  [8-DIP_MODULE]  53.09 14.1 0 top
U18  24AA025E48T-I/SN  [SOIC8]  130.28 10.25 90 top
U19  LTC2945CUD  [QFN12]  116.29 9.73 0 top
U20  TPS7A8500RGRT  [QFN20_3P65MMSQ]  80.65 8.99 270 bottom
U21  TPS7A8500RGRT  [QFN20_3P65MMSQ]  98.76 9.07 270 bottom
U22  LTC2945CUD  [QFN12]  74.14 14.67 90 bottom
U23  LTC2945CUD  [QFN12]  92.25 14.75 90 bottom
U24  LTC2945CUD  [QFN12]  55.25 17.14 180 bottom
U25  NBSG53AMNG  [QFN16]  121.8 29.08 0 bottom
Y1  50MHz  [4-SMD]  94.55 50.12 180 top

## Library data of the parts
C1 C2 C16 C17 C39 C40 C42-C45 = CAP_NP_0: Tolerance: TOL?; User Part Number: PN?; room: TE0712
C3-C5 C7 C98 C157 C158 C161 C162 C166-C172 = CAP_NP: Tolerance: TOL?; User Part Number: PN?; room: CDR_1
C6 C12-C14 C22 C27 C29 C49 C117 C118 C122 C124 C126-C128 C137 C141 C145 C149 C151 C152 C156 C159 = CAP_NP: Tolerance: TOL?; User Part Number: PN?; room: CLK_GEN_x12
C8 C19 C20 C37 C38 C113 C120 C134 C135 = CAP_NP: Tolerance: TOL?; User Part Number: PN?; room: CLK_FO_6_11
C9 C138 C146 C147 C154 C164 C165 = CAP_NP: Tolerance: TOL?; User Part Number: PN?; room: CLK_FO_0_5
C10 C11 = CAP_NP_0: Tolerance: TOL?; User Part Number: PN?; room: CLK_FO_0_5
C15 C28 C31 C33-C36 C125 C136 C148 C150 C153 = CAP_NP_0: Tolerance: TOL?; User Part Number: PN?; room: CLK_GEN_x12
C18 C21 C24 C32 C111 C112 C115 C119 C121 C123 C129-C133 = CAP_NP: Tolerance: TOL?; User Part Number: PN?; room: CDR_0
C23 C25 = CAP_NP: Tolerance: TOL?; User Part Number: PN?; room: SFP I2C SWITCH
C26 C30 = CAP_NP_0: Tolerance: TOL?; User Part Number: PN?; room: CLK_FO_6_11
C41 C163 = CAP_NP: Tolerance: TOL?; User Part Number: PN?; room: TE0712
C46 C53 C103 = CAP_NP: Tolerance: TOL?; User Part Number: PN?; room: MMC_DISCRETE
C47 C48 C52 C85 C92 C94 = CAP_NP: Tolerance: TOL?; User Part Number: PN?; room: MAIN_PWR
C50 C51 C60 C62 C68 C70 C72 C75 C79 C83 C84 = CAP_NP: Tolerance: TOL?; User Part Number: PN?; room: VP3V3
C54-C57 C64 C65 C73 = CAP_NP: Tolerance: TOL?; User Part Number: PN?; room: VCC1V8
C58 = CAP_NP_0: Tolerance: TOL?; User Part Number: PN?; room: VP3V3
C59 = CAP_NP_0: Tolerance: TOL?; User Part Number: PN?; room: VCC3V3I_V
C61 C63 C67 C69 C71 C74 C78 C81 C82 = CAP_NP: Tolerance: TOL?; User Part Number: PN?; room: VCC3V3I_V
C66 = CAP_NP: Tolerance: TOL?; User Part Number: PN?; room: EEPROM
C76 = CAP_NP_0: Tolerance: TOL?; User Part Number: PN?; room: VCC1V8
C77 C80 = CAP_POL: room: MAIN_PWR
C86-C90 C93 C95 C106-C110 C114 C116 C139 C140 C142-C144 C155 C160 = CAP_NP: Tolerance: TOL?; User Part Number: PN?; room: SFP0
C91 = CAP_NP_0: Tolerance: TOL?; User Part Number: PN?; room: MAIN_PWR
C96 = CAP_NP: Tolerance: TOL?; User Part Number: PN?; room: JTAG
C97 C99 C100 = CAP_NP: Tolerance: TOL?; User Part Number: PN?; room: DFF_XBAR
C101 C102 C104 C105 = CAP_NP_0: Tolerance: TOL?; User Part Number: PN?; room: DFF_XBAR
D1 = LED GREEN 0603_0: room: MMC
D2 = LED RED 0603_0: room: MMC
D3 = LED_0: room: MMC
D4 D7 = LED RED 0603_0: room: VCC3V3I_V
D5 = LED RED 0603_0: room: VCC1V8
D6 = LED RED 0603_0: room: VP3V3
D8-D11 = TVS_2x: Tolerance: TOL?; User Part Number: PN?; room: JTAG
D12 = DIODE: room: MMC_DISCRETE
J1 = CONN10_SIP
J2 = TE0712 Connector-JB1
J3 JTG3 = LSHM-130-0xxx-L-DV-A-S
J4 J7 J12 = CON20P_SFP-1367073-1: room: SFP0
J5 = CONN30P
J6 = TE0712 Connector-JB3
J8 = MCH_CONNECTOR1
J9 = TE0712 Connector-JB2
J10 JTG2 = LSHM-150-0xxx-L-DV-A-S
J11 = 7x2RECPT_SMD_2mm: User Part Number: PN?; room: JTAG; signal model: ZA8H-24-033-Z-07_B_ZA8H_168_A_(_ZA8H-24-0.33-Z-07
J13 J14 = HDR1x3: room: USB-JTAG
JTG1 = MCH_CONNECTOR2_ALT2
L5 = IND: room: CDR_0
L6 L7 = IND: room: CLK_GEN_x12
L15-L20 = IND: room: SFP0
L21 = IND: room: CLK_FO_0_5
L22 = IND: room: CDR_1
L23 = IND: room: CLK_FO_6_11
L24 = IND: room: MMC_DISCRETE
MH1-MH4 = Mt_Hole: room: TE0712
MH5-MH10 MTG1-MTG4 = Mt_Hole
Q2 = BSS138: room: VCC1V8
R1 R3 R5 R7 R9 R11 R12 R14 R16 R17 R137 = R: Tolerance: TOL?; User Part Number: PN?; room: CDR_1
R2 R4 R6 R57 R61 = R: Tolerance: TOL?; User Part Number: PN?; room: MMC
R13 = R: Tolerance: TOL?; User Part Number: PN?; room: CLK_FO_0_5
R15 R33 R35 = R: Tolerance: TOL?; User Part Number: PN?; room: TE0712
R18 R122-R125 R127-R130 = R: Tolerance: TOL?; User Part Number: PN?; room: SFP I2C SWITCH
R19 R22-R25 R27 R29 R32 R126 R132 = R: Tolerance: TOL?; User Part Number: PN?; room: CLK_GEN_x12
R20 R21 R28 R30 R31 R34 R36-R38 R121 = R: Tolerance: TOL?; User Part Number: PN?; room: CDR_0
R26 = R: Tolerance: TOL?; User Part Number: PN?; room: CLK_FO_6_11
R39 R41 R43 R45 R46 R49 R52 R103 R104 = R: Tolerance: TOL?; User Part Number: PN?; room: DFF_XBAR
R40 R42 R44 R47 R48 R50 R55 R58-R60 R64 R96 R105-R108 R110-R114 R116 = R: Tolerance: TOL?; User Part Number: PN?; room: MMC_DISCRETE
R51 R53 R54 R56 = R: Tolerance: TOL?; User Part Number: PN?; room: JTAG
R62 R67 R70-R72 R75 = R: Tolerance: TOL?; User Part Number: PN?; room: VCC1V8
R63 R68 R85 R88 R93 R94 R100 = R: Tolerance: TOL?; User Part Number: PN?; room: MAIN_PWR
R65 R69 R73 R87 R89 R90 R92 = R: Tolerance: TOL?; User Part Number: PN?; room: VP3V3
R66 R74 R82 R86 R91 = R: Tolerance: TOL?; User Part Number: PN?; room: VCC3V3I_V
R76-R81 = R: Tolerance: TOL?; User Part Number: PN?; room: EEPROM
R83 R84 R97 R109 R138-R140 = R: Tolerance: TOL?; User Part Number: PN?
R95 R98 R99 R101 R102 R115 R117-R120 R131 R133-R136 = R: Tolerance: TOL?; User Part Number: PN?; room: SFP0
SW1 = HDT0001: room: MMC
TP1-TP4 = TESTPOINT: room: CLK_GEN_x12
TP5 TP15 = TESTPOINT: room: MAIN_PWR
TP6 TP10 TP12 = TESTPOINT: room: VP3V3
TP7 TP11 TP13 = TESTPOINT: room: VCC3V3I_V
TP8 TP9 TP14 = TESTPOINT: room: VCC1V8
U1 = LP_515XXX
U2 = MAX9152ESE+T: room: CDR_1
U3 = ADN2814ACPZ: room: CDR_1
U4 = SI53342-B-GM: room: CLK_FO_0_5
U5 U11 U14 = SFP_CAGE-2227023-1: room: SFP0
U6 = SI5395A-A-GM: room: CLK_GEN_x12
U7 = 4-Channel-I2C: room: SFP I2C SWITCH
U8 = MAX9152ESE+T: room: CDR_0
U9 = SI53342-B-GM: room: CLK_FO_6_11
U10 = ADN2814ACPZ: room: CDR_0
U12 = MAX9152ESE+T: room: DFF_XBAR
U13 = ATMGA128: room: MMC_DISCRETE
U15 = INV_1CH_OD: room: MMC_DISCRETE
U16 = TPS74618P: room: VCC1V8
U17 = UWS_SERIES: room: MAIN_PWR
U18 = 24AA025E48T-I/SN: room: EEPROM
U19 = LTC2945CUD: room: VCC1V8
U20 = TPS7A8500RGRT: room: VCC3V3I_V
U21 = TPS7A8500RGRT: room: VP3V3
U22 = LTC2945CUD: room: VCC3V3I_V
U23 = LTC2945CUD: room: VP3V3
U24 = LTC2945CUD: room: MAIN_PWR
U25 = NBSG53AMNG: room: DFF_XBAR
Y1 = 4-SMD_CRYSTAL: room: CLK_GEN_x12

## Footprints (pads in the part's own frame, mm; a bottom-side part is the same pattern mirrored in y, then rotated)
4-SMD
  rect 1.1x0.9 smd: 1(-0.85,-0.65) 2(0.85,-0.65) 3(0.85,0.65) 4(-0.85,0.65)
6-WSON_2X2
  rrect 0.5x0.3 smd: 1(-0.95,0.65) 2(-0.95,0) 3(-0.95,-0.65) 4(0.95,-0.65) 5(0.95,0) 6(0.95,0.65)
  rrect 0.9x1.6 smd: 7(0,0)
8-DIP_MODULE
  round 3.048 hole 1.575: 1(-13.97,7.62) 2(-13.97,0) 3(-13.97,-7.62) 5(13.97,-3.81) 6(13.97,0) 7(13.97,3.81)
  round 3.302 hole 2.134: 4(13.97,-7.62) 8(13.97,7.62)
AMC0_R2_BPLUS_PCB_EDGE
  rect 1.3x0.5 smd: (-0.888,21) (-0.888,9.75) (-0.888,-1.5) (-0.888,-12.75) (-0.888,-19.5) (-0.888,-26.25) (-0.888,-27.75) (-0.888,-27.75) (-0.888,-28.5) (-0.888,-28.5) (-0.888,-29.25) (-0.888,-30) (-0.888,-30.75)
  rect 1.7x0.5 smd: (-0.7,30.75) (-0.7,30) (-0.7,28.5) (-0.7,28.5) (-0.7,27.75) (-0.7,27.75) (-0.7,26.25) (-0.7,26.25) (-0.7,25.5) (-0.7,25.5) (-0.7,24) (-0.7,24) (-0.7,23.25) (-0.7,23.25) (-0.7,21.75) (-0.7,21) (-0.7,19.5) (-0.7,19.5) (-0.7,18.75) (-0.7,18.75) (-0.7,17.25) (-0.7,17.25) (-0.7,16.5) (-0.7,16.5) (-0.7,15) (-0.7,15) (-0.7,14.25) (-0.7,14.25) (-0.7,12.75) (-0.7,12.75) (-0.7,12) (-0.7,10.5) (-0.7,9.75) (-0.7,8.25) (-0.7,8.25) (-0.7,7.5) (-0.7,7.5) (-0.7,6) (-0.7,6) (-0.7,5.25) (-0.7,5.25) (-0.7,3.75) (-0.7,3.75) (-0.7,3) (-0.7,3) (-0.7,1.5) (-0.7,1.5) (-0.7,0.75) (-0.7,0.75) (-0.7,-0.75) (-0.7,-1.5) (-0.7,-3) (-0.7,-3) (-0.7,-3.75) (-0.7,-3.75) (-0.7,-5.25) (-0.7,-5.25) (-0.7,-6) (-0.7,-6) (-0.7,-7.5) (-0.7,-7.5) (-0.7,-8.25) (-0.7,-8.25) (-0.7,-9.75) (-0.7,-9.75) (-0.7,-10.5) (-0.7,-10.5) (-0.7,-12) (-0.7,-12.75) (-0.7,-14.25) (-0.7,-14.25) (-0.7,-15) (-0.7,-15) (-0.7,-16.5) (-0.7,-16.5) (-0.7,-17.25) (-0.7,-17.25) (-0.7,-18.75) (-0.7,-19.5) (-0.7,-21) (-0.7,-21) (-0.7,-21.75) (-0.7,-21.75) (-0.7,-23.25) (-0.7,-23.25) (-0.7,-24) (-0.7,-24) (-0.7,-25.5) (-0.7,-26.25)
  rect 2x0.5 smd: (-0.55,30) (-0.55,-30)
  rect 3.1x0.5 smd: 1(0,-31.5) 2(0,-30.75) 4(0,-29.25) 7(0,-27) 9(0,-25.5) 10(0,-24.75) 13(0,-22.5) 16(0,-20.25) 18(0,-18.75) 19(0,-18) 22(0,-15.75) 25(0,-13.5) 27(0,-12) 28(0,-11.25) 31(0,-9) 34(0,-6.75) 37(0,-4.5) 40(0,-2.25) 42(0,-0.75) 43(0,0) 46(0,2.25) 49(0,4.5) 52(0,6.75) 55(0,9) 57(0,10.5) 58(0,11.25) 61(0,13.5) 64(0,15.75) 67(0,18) 70(0,20.25) 72(0,21.75) 73(0,22.5) 76(0,24.75) 79(0,27) 82(0,29.25) 84(0,30.75) 85(0,31.5) 86(0,31.5) 89(0,29.25) 92(0,27) 95(0,24.75) 98(0,22.5) 101(0,20.25) 104(0,18) 107(0,15.75) 110(0,13.5) 112(0,12) 113(0,11.25) 116(0,9) 119(0,6.75) 122(0,4.5) 125(0,2.25) 128(0,0) 131(0,-2.25) 134(0,-4.5) 137(0,-6.75) 140(0,-9) 143(0,-11.25) 146(0,-13.5) 149(0,-15.75) 152(0,-18) 155(0,-20.25) 158(0,-22.5) 161(0,-24.75) 164(0,-27) 170(0,-31.5)
  rect 0.9x0.5 smd: 3(1.1,-30) 83(1.1,30)
  rect 1.6x0.5 smd: 5(0.762,-28.5) 6(0.762,-27.75) 8(0.762,-26.25) 17(0.762,-19.5) 26(0.762,-12.75) 41(0.762,-1.5) 56(0.762,9.75) 71(0.762,21) 165(0.762,-27.75) 166(0.762,-28.5) 167(0.762,-29.25) 168(0.762,-30) 169(0.762,-30.75)
  rect 1.2x0.5 smd: 11(0.95,-24) 12(0.95,-23.25) 14(0.95,-21.75) 15(0.95,-21) 20(0.95,-17.25) 21(0.95,-16.5) 23(0.95,-15) 24(0.95,-14.25) 29(0.95,-10.5) 30(0.95,-9.75) 32(0.95,-8.25) 33(0.95,-7.5) 35(0.95,-6) 36(0.95,-5.25) 38(0.95,-3.75) 39(0.95,-3) 44(0.95,0.75) 45(0.95,1.5) 47(0.95,3) 48(0.95,3.75) 50(0.95,5.25) 51(0.95,6) 53(0.95,7.5) 54(0.95,8.25) 59(0.95,12) 60(0.95,12.75) 62(0.95,14.25) 63(0.95,15) 65(0.95,16.5) 66(0.95,17.25) 68(0.95,18.75) 69(0.95,19.5) 74(0.95,23.25) 75(0.95,24) 77(0.95,25.5) 78(0.95,26.25) 80(0.95,27.75) 81(0.95,28.5) 87(0.95,30.75) 88(0.95,30) 90(0.95,28.5) 91(0.95,27.75) 93(0.95,26.25) 94(0.95,25.5) 96(0.95,24) 97(0.95,23.25) 99(0.95,21.75) 100(0.95,21) 102(0.95,19.5) 103(0.95,18.75) 105(0.95,17.25) 106(0.95,16.5) 108(0.95,15) 109(0.95,14.25) 111(0.95,12.75) 114(0.95,10.5) 115(0.95,9.75) 117(0.95,8.25) 118(0.95,7.5) 120(0.95,6) 121(0.95,5.25) 123(0.95,3.75) 124(0.95,3) 126(0.95,1.5) 127(0.95,0.75) 129(0.95,-0.75) 130(0.95,-1.5) 132(0.95,-3) 133(0.95,-3.75) 135(0.95,-5.25) 136(0.95,-6) 138(0.95,-7.5) 139(0.95,-8.25) 141(0.95,-9.75) 142(0.95,-10.5) 144(0.95,-12) 145(0.95,-12.75) 147(0.95,-14.25) 148(0.95,-15) 150(0.95,-16.5) 151(0.95,-17.25) 153(0.95,-18.75) 154(0.95,-19.5) 156(0.95,-21) 157(0.95,-21.75) 159(0.95,-23.25) 160(0.95,-24) 162(0.95,-25.5) 163(0.95,-26.25)
CAP0402
  rect 0.635x0.686 smd: 1(-0.499,0) 2(0.499,0)
CAP0603
  rect 1.05x1.08 smd: 1(-0.865,0) 2(0.865,0)
CAP0805
  rect 1.3x1.5 smd: 1(-1,0) 2(1,0)
CAP1206
  rect 1.5x2 smd: 1(-1.5,0) 2(1.5,0)
CAP2917
  rect 2.4x2.9 smd: 1(-3.048,0) 2(3.048,0)
D0603
  rect 1.05x1.08 smd: 1(-0.865,0) 2(0.865,0)
FTSH-115-01-L-DV
  rect 2.794x0.737 smd: 1(-2.032,8.89) 2(2.032,8.89) 3(-2.032,7.62) 4(2.032,7.62) 5(-2.032,6.35) 6(2.032,6.35) 7(-2.032,5.08) 8(2.032,5.08) 9(-2.032,3.81) 10(2.032,3.81) 11(-2.032,2.54) 12(2.032,2.54) 13(-2.032,1.27) 14(2.032,1.27) 15(-2.032,0) 16(2.032,0) 17(-2.032,-1.27) 18(2.032,-1.27) 19(-2.032,-2.54) 20(2.032,-2.54) 21(-2.032,-3.81) 22(2.032,-3.81) 23(-2.032,-5.08) 24(2.032,-5.08) 25(-2.032,-6.35) 26(2.032,-6.35) 27(-2.032,-7.62) 28(2.032,-7.62) 29(-2.032,-8.89) 30(2.032,-8.89)
HDR14PINSMD
  round 1.092 hole 0.991: (-5,0) (5,0)
  rect 0.991x2.743 smd: 1(6,2.125) 2(6,-2.125) 3(4,2.125) 4(4,-2.125) 5(2,2.125) 6(2,-2.125) 7(0,2.125) 8(0,-2.125) 9(-2,2.125) 10(-2,-2.125) 11(-4,2.125) 12(-4,-2.125) 13(-6,2.125) 14(-6,-2.125)
HDR_1X3
  round 1.524 hole 0.889: 1(0,0) 2(2.54,0) 3(5.08,0)
INDC1005X60N
  rect 0.6x0.7 smd: 1(-0.5,0) 2(0.5,0)
INDC2013X105N
  rect 1.15x1.45 smd: 1(-0.9,0) 2(0.9,0)
INDC2520X220N
  rect 0.95x2.3 smd: 1(-1.25,0) 2(1.25,0)
LEDC1608X80N
  rect 0.9x0.95 smd: 1(-0.8,0) 2(0.8,0)
LP_515XXX
  round 1.524 hole 1.524 unplated: (-2.032,3.988) (0,0) (0,-3.988)
M4010C
  rect 0.635x1.651 smd: 1(0,0) 2(1,0) 3(2,0) 4(3,0) 5(4,0) 6(5,0) 7(6,0) 8(7,0) 9(8,0) 10(9,0)
  rect 1.2x1.8 smd: G1(-1.3,-3.8) G2(10.3,-3.8)
MOUNTHOLE
  round 6.096 hole 3.302: 1(0,0)
QFN12
  rect 0.711x0.254 smd: 1(-1.4,0.5) 2(-1.4,0) 3(-1.4,-0.5) 7(1.4,-0.5) 8(1.4,0) 9(1.4,0.5)
  rect 0.254x0.711 smd: 4(-0.5,-1.4) 5(0,-1.4) 6(0.5,-1.4) 10(0.5,1.4) 11(0,1.4) 12(-0.5,1.4)
  rect 1.651x1.651 smd: 13(0,0)
QFN16
  rect 0.61x0.305 smd: 1(-1.9,0.975) 2(-1.9,0.325) 3(-1.9,-0.325) 4(-1.9,-0.975) 9(1.9,-0.975) 10(1.9,-0.325) 11(1.9,0.325) 12(1.9,0.975)
  rect 0.305x0.61 smd: 5(-0.975,-1.9) 6(-0.325,-1.9) 7(0.325,-1.9) 8(0.975,-1.9) 13(0.975,1.9) 14(0.325,1.9) 15(-0.325,1.9) 16(-0.975,1.9)
  rect 2.489x2.489 smd: 17(0,0)
QFN20_3P65MMSQ
  rrect 0.51x0.305 smd: 1(-1.82,1) 2(-1.82,0.5) 3(-1.82,0) 4(-1.82,-0.5) 5(-1.82,-1) 11(1.82,-1) 12(1.82,-0.5) 13(1.82,0) 14(1.82,0.5) 15(1.82,1)
  rrect 0.305x0.51 smd: 6(-1,-1.82) 7(-0.5,-1.82) 8(0,-1.82) 9(0.5,-1.82) 10(1,-1.82) 16(1,1.82) 17(0.5,1.82) 18(0,1.82) 19(-0.5,1.82) 20(-1,1.82)
  rect 2.032x2.032 smd: 21(0,0)
QFN-32
  rect 0.851x0.3 smd: 1(-2.475,1.75) 2(-2.475,1.25) 3(-2.475,0.75) 4(-2.475,0.25) 5(-2.475,-0.25) 6(-2.475,-0.75) 7(-2.475,-1.25) 8(-2.475,-1.75) 17(2.475,-1.75) 18(2.475,-1.25) 19(2.475,-0.75) 20(2.475,-0.25) 21(2.475,0.25) 22(2.475,0.75) 23(2.475,1.25) 24(2.475,1.75)
  rect 0.3x0.851 smd: 9(-1.75,-2.475) 10(-1.25,-2.475) 11(-0.75,-2.475) 12(-0.25,-2.475) 13(0.25,-2.475) 14(0.75,-2.475) 15(1.25,-2.475) 16(1.75,-2.475) 25(1.75,2.475) 26(1.25,2.475) 27(0.75,2.475) 28(0.25,2.475) 29(-0.25,2.475) 30(-0.75,2.475) 31(-1.25,2.475) 32(-1.75,2.475)
  rect 2.337x2.337 smd: 33(0,0)
QFN_24
  rect 0.61x0.305 smd: 1(-2.019,1.25) 2(-2.019,0.75) 3(-2.019,0.25) 4(-2.019,-0.25) 5(-2.019,-0.75) 6(-2.019,-1.25) 13(2.019,-1.25) 14(2.019,-0.75) 15(2.019,-0.25) 16(2.019,0.25) 17(2.019,0.75) 18(2.019,1.25)
  rect 0.305x0.61 smd: 7(-1.25,-2.019) 8(-0.75,-2.019) 9(-0.25,-2.019) 10(0.25,-2.019) 11(0.75,-2.019) 12(1.25,-2.019) 19(1.25,2.019) 20(0.75,2.019) 21(0.25,2.019) 22(-0.25,2.019) 23(-0.75,2.019) 24(-1.25,2.019)
  rect 2.489x2.489 smd: 25(0,0)
QFN_64
  rect 0.61x0.279 smd: 1(-4.394,3.75) 2(-4.394,3.25) 3(-4.394,2.75) 4(-4.394,2.25) 5(-4.394,1.75) 6(-4.394,1.25) 7(-4.394,0.75) 8(-4.394,0.25) 9(-4.394,-0.25) 10(-4.394,-0.75) 11(-4.394,-1.25) 12(-4.394,-1.75) 13(-4.394,-2.25) 14(-4.394,-2.75) 15(-4.394,-3.25) 16(-4.394,-3.75) 33(4.394,-3.75) 34(4.394,-3.25) 35(4.394,-2.75) 36(4.394,-2.25) 37(4.394,-1.75) 38(4.394,-1.25) 39(4.394,-0.75) 40(4.394,-0.25) 41(4.394,0.25) 42(4.394,0.75) 43(4.394,1.25) 44(4.394,1.75) 45(4.394,2.25) 46(4.394,2.75) 47(4.394,3.25) 48(4.394,3.75)
  rect 0.279x0.61 smd: 17(-3.75,-4.394) 18(-3.25,-4.394) 19(-2.75,-4.394) 20(-2.25,-4.394) 21(-1.75,-4.394) 22(-1.25,-4.394) 23(-0.75,-4.394) 24(-0.25,-4.394) 25(0.25,-4.394) 26(0.75,-4.394) 27(1.25,-4.394) 28(1.75,-4.394) 29(2.25,-4.394) 30(2.75,-4.394) 31(3.25,-4.394) 32(3.75,-4.394) 49(3.75,4.394) 50(3.25,4.394) 51(2.75,4.394) 52(2.25,4.394) 53(1.75,4.394) 54(1.25,4.394) 55(0.75,4.394) 56(0.25,4.394) 57(-0.25,4.394) 58(-0.75,4.394) 59(-1.25,4.394) 60(-1.75,4.394) 61(-2.25,4.394) 62(-2.75,4.394) 63(-3.25,4.394) 64(-3.75,4.394)
  rect 4.4x4.4 smd: 65(0,0)
RES0402
  rect 0.55x0.6 smd: 1(-0.45,0) 2(0.45,0)
RES0603
  rect 0.95x0.95 smd: 1(-0.75,0) 2(0.75,0)
RES0805
  rect 1.1x1.4 smd: 1(-0.95,0) 2(0.95,0)
RES1206
  rect 1.25x1.75 smd: 1(-1.45,0) 2(1.45,0)
SAMTEC_LSHM-130-04-0-L-DV-A-S
  round 1 hole 1.45 unplated: (-8.5,-0.9) (8.5,-0.9)
  rect 0.3x1.5 smd: 1(7.25,-1.9) 2(7.25,1.8) 3(6.75,-1.9) 4(6.75,1.8) 5(6.25,-1.9) 6(6.25,1.8) 7(5.75,-1.9) 8(5.75,1.8) 9(5.25,-1.9) 10(5.25,1.8) 11(4.75,-1.9) 12(4.75,1.8) 13(4.25,-1.9) 14(4.25,1.8) 15(3.75,-1.9) 16(3.75,1.8) 17(3.25,-1.9) 18(3.25,1.8) 19(2.75,-1.9) 20(2.75,1.8) 21(2.25,-1.9) 22(2.25,1.8) 23(1.75,-1.9) 24(1.75,1.8) 25(1.25,-1.9) 26(1.25,1.8) 27(0.75,-1.9) 28(0.75,1.8) 29(0.25,-1.9) 30(0.25,1.8) 31(-0.25,-1.9) 32(-0.25,1.8) 33(-0.75,-1.9) 34(-0.75,1.8) 35(-1.25,-1.9) 36(-1.25,1.8) 37(-1.75,-1.9) 38(-1.75,1.8) 39(-2.25,-1.9) 40(-2.25,1.8) 41(-2.75,-1.9) 42(-2.75,1.8) 43(-3.25,-1.9) 44(-3.25,1.8) 45(-3.75,-1.9) 46(-3.75,1.8) 47(-4.25,-1.9) 48(-4.25,1.8) 49(-4.75,-1.9) 50(-4.75,1.8) 51(-5.25,-1.9) 52(-5.25,1.8) 53(-5.75,-1.9) 54(-5.75,1.8) 55(-6.25,-1.9) 56(-6.25,1.8) 57(-6.75,-1.9) 58(-6.75,1.8) 59(-7.25,-1.9) 60(-7.25,1.8)
  round 1.702 hole 1.016: 61(-9.975,1.1) 62(9.975,1.1)
SAMTEC_LSHM-150-04-0-L-DV-A-S
  round 1 hole 1.45 unplated: (-13.5,-0.9) (13.5,-0.9)
  rect 0.3x1.5 smd: 1(12.25,-1.9) 2(12.25,1.8) 3(11.75,-1.9) 4(11.75,1.8) 5(11.25,-1.9) 6(11.25,1.8) 7(10.75,-1.9) 8(10.75,1.8) 9(10.25,-1.9) 10(10.25,1.8) 11(9.75,-1.9) 12(9.75,1.8) 13(9.25,-1.9) 14(9.25,1.8) 15(8.75,-1.9) 16(8.75,1.8) 17(8.25,-1.9) 18(8.25,1.8) 19(7.75,-1.9) 20(7.75,1.8) 21(7.25,-1.9) 22(7.25,1.8) 23(6.75,-1.9) 24(6.75,1.8) 25(6.25,-1.9) 26(6.25,1.8) 27(5.75,-1.9) 28(5.75,1.8) 29(5.25,-1.9) 30(5.25,1.8) 31(4.75,-1.9) 32(4.75,1.8) 33(4.25,-1.9) 34(4.25,1.8) 35(3.75,-1.9) 36(3.75,1.8) 37(3.25,-1.9) 38(3.25,1.8) 39(2.75,-1.9) 40(2.75,1.8) 41(2.25,-1.9) 42(2.25,1.8) 43(1.75,-1.9) 44(1.75,1.8) 45(1.25,-1.9) 46(1.25,1.8) 47(0.75,-1.9) 48(0.75,1.8) 49(0.25,-1.9) 50(0.25,1.8) 51(-0.25,-1.9) 52(-0.25,1.8) 53(-0.75,-1.9) 54(-0.75,1.8) 55(-1.25,-1.9) 56(-1.25,1.8) 57(-1.75,-1.9) 58(-1.75,1.8) 59(-2.25,-1.9) 60(-2.25,1.8) 61(-2.75,-1.9) 62(-2.75,1.8) 63(-3.25,-1.9) 64(-3.25,1.8) 65(-3.75,-1.9) 66(-3.75,1.8) 67(-4.25,-1.9) 68(-4.25,1.8) 69(-4.75,-1.9) 70(-4.75,1.8) 71(-5.25,-1.9) 72(-5.25,1.8) 73(-5.75,-1.9) 74(-5.75,1.8) 75(-6.25,-1.9) 76(-6.25,1.8) 77(-6.75,-1.9) 78(-6.75,1.8) 79(-7.25,-1.9) 80(-7.25,1.8) 81(-7.75,-1.9) 82(-7.75,1.8) 83(-8.25,-1.9) 84(-8.25,1.8) 85(-8.75,-1.9) 86(-8.75,1.8) 87(-9.25,-1.9) 88(-9.25,1.8) 89(-9.75,-1.9) 90(-9.75,1.8) 91(-10.25,-1.9) 92(-10.25,1.8) 93(-10.75,-1.9) 94(-10.75,1.8) 95(-11.25,-1.9) 96(-11.25,1.8) 97(-11.75,-1.9) 98(-11.75,1.8) 99(-12.25,-1.9) 100(-12.25,1.8)
  round 1.702 hole 1.016: 101(-14.975,1.1) 102(14.975,1.1)
SFP_CAGE
  rect 1.75x1.75 hole 1.05: 1(-30.9,7.125) 2(-20.9,7.125) 3(-10.9,7.125) 5(-25.9,-7.125) 6(-15.9,-7.125) 7(-5.9,-7.125) 8(4.1,-7.125) 9(-30.9,-1.455) 10(-10.9,1.445) 11(-10.9,-3.955)
  rect 1.55x1.55 hole 0.85: 4(-0.9,7.125)
  round 1.65 hole 0.95: 12(-8.1,7.125) 13(-3.4,7.125) 14(1.6,7.125) 15(-8.1,-7.125) 16(-3.4,-7.125) 17(1.6,-7.125) 18(6.2,-4.805) 19(6.2,-0.005) 20(6.2,4.796)
SOD123
  rect 1x0.75 smd: A(1.8,0) C(-1.8,0)
SOIC8
  rect 1.778x0.635 smd: 1(-2.489,1.905) 2(-2.489,0.635) 3(-2.489,-0.635) 4(-2.489,-1.905) 5(2.489,-1.905) 6(2.489,-0.635) 7(2.489,0.635) 8(2.489,1.905)
SOIC127P600X175-16N
  rect 1.55x0.6 smd: 1(-2.7,4.445) 2(-2.7,3.175) 3(-2.7,1.905) 4(-2.7,0.635) 5(-2.7,-0.635) 6(-2.7,-1.905) 7(-2.7,-3.175) 8(-2.7,-4.445) 9(2.7,-4.445) 10(2.7,-3.175) 11(2.7,-1.905) 12(2.7,-0.635) 13(2.7,0.635) 14(2.7,1.905) 15(2.7,3.175) 16(2.7,4.445)
SOT23-5
  rect 1.016x0.711 smd: 1(-1.295,0.953) 2(-1.295,0) 3(-1.295,-0.953) 4(1.295,-0.953) 5(1.295,0.953)
SOT95P230X110-3N
  rect 0.95x0.6 smd: 1(-1.15,0.95) 2(-1.15,-0.95) 3(1.15,0)
SW_HDT0001
  round 0.5 hole 0.6 unplated: (-0.85,0)
  round 0.5 hole 0.8 unplated: (0.85,0)
  rect 0.6x1 smd: 1(1.1,-1.35) 2(-1.1,-1.35) 3(1.1,1.35) 4(-1.1,1.35)
TP_KEYSTONE_5000A
  round 1.65 hole 1: 1(0,0)
TSSOP-16P_P65MM
  oval 1.6x0.45 smd: 1(-2.85,2.275) 2(-2.85,1.625) 3(-2.85,0.975) 4(-2.85,0.325) 5(-2.85,-0.325) 6(-2.85,-0.975) 7(-2.85,-1.625) 8(-2.85,-2.275) 9(2.85,-2.275) 10(2.85,-1.625) 11(2.85,-0.975) 12(2.85,-0.325) 13(2.85,0.325) 14(2.85,0.975) 15(2.85,1.625) 16(2.85,2.275)
TYCO_1367073
  round 1 hole 1.55 unplated: (0,4.795) (0,-4.805)
  rect 2x0.5 smd: 1(-4.1,3.395) 2(-4.1,2.595) 3(-4.1,1.795) 4(-4.1,0.995) 5(-4.1,0.195) 6(-4.1,-0.605) 7(-4.1,-1.405) 8(-4.1,-2.205) 9(-4.1,-3.005) 10(-4.1,-3.805) 11(4.1,-3.405) 12(4.1,-2.605) 13(4.1,-1.805) 14(4.1,-1.005) 15(4.1,-0.205) 16(4.1,0.595) 17(4.1,1.395) 18(4.1,2.195) 19(4.1,2.995) 20(4.1,3.795)

## Nets
